# Altium PCB PCB02.PcbDoc
Units mm, origin at the board's own origin, x right, y up, seen from the top; angles counter-clockwise.
Board outline 20 x 26 mm, 2 copper layers (Top Layer, Bottom Layer), stack 1.57 mm thick; 2 components, 4 nets, 12 pads, 0 vias.
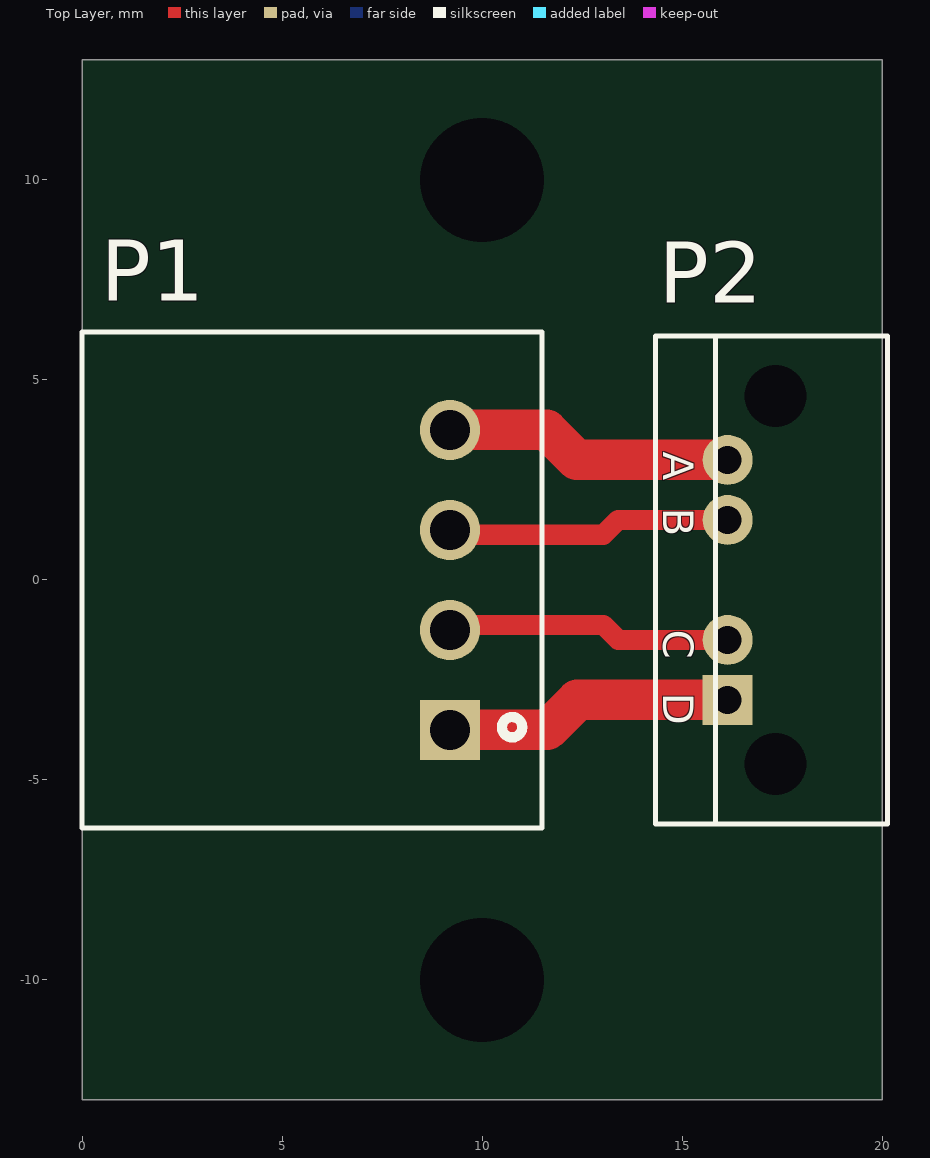
[diagram p0: Top Layer view]
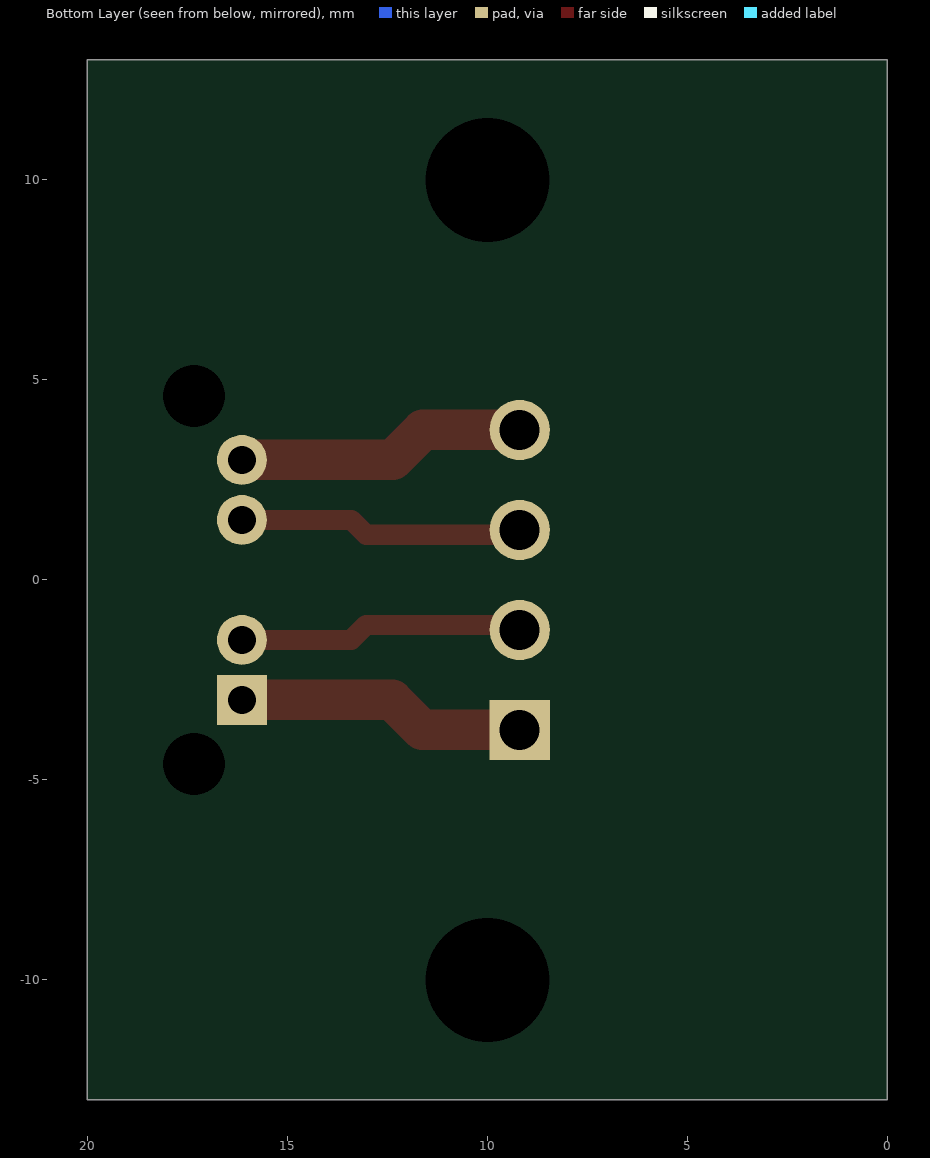
[diagram p1: Bottom Layer view, seen from below]

## Layer stack, top to bottom
Top Solder: solder mask 0.01, Solder Resist, Dk 3.5
Top Layer: signal copper 0.035
Dielectric 1: core 1.5, FR-4, Dk 4.8
Bottom Layer: signal copper 0.035
Bottom Solder: solder mask 0.01, Solder Resist, Dk 3.5

## Board outline
0,-13 20,-13 20,13 0,13

## Design rules (kind name [scope] priority, off if disabled: settings)
Clearance [All] p1: gap=0.254 ignorepadtopadclearanceinfootprint=FALSE except(0.203: THPad-THPad)
HoleSize [All] p1: absolutevalues=TRUE maxlimit=3.1 minlimit=0.025 maxpercent=80.000 minpercent=20.000
MinimumSolderMaskSliver [All] p1: minsoldermaskwidth=0
PolygonConnect [All] p1: connectstyle=Relief reliefconductorwidth=0.254 reliefentries=4 polygonreliefangle="90 Angle" airgapwidth=0.254
RoutingVias [All] p1: holewidth=0.3 width=0.6 viastyle="Through Hole" minholewidth=0.3 minwidth=0.6 maxholewidth=0.3 maxwidth=0.6
SilkToSilkClearance [All] p1: silktosilkclearance=0
SilkToSolderMaskClearance [IsPad] p1: minsilkscreentomaskgap=0 clearancetoexposedcopper=TRUE
SolderMaskExpansion [All] p1: expansion=0.102 istentingtop=FALSE
UnRoutedNet [All] p1: checkbadconnections=TRUE
Width [All] p1: maxlimit=1.27 minlimit=0.254 preferedwidth=0.254 minimp=50.000000 maximp=50.000000 favimp=50.000000
25 further rules are at their usual default settings.

## Components (designator, comment, footprint, x,y, rotation, side; value= is the part's Value field where it differs from the comment)
P1 "S4B-XH-A(LF)(SN)" JST_S4B-XH-A(LF)(SN) 9.195,0 r90 top
P2 "HY41226278AM061265W" HY41226278AM061265W 16.739,0 r270 top

## Footprints (in the part's own frame and the unit in brackets; to place one, negate y for a bottom-side part, rotate by r counter-clockwise, add the part's x,y. Pads: shape width x height; smd on the part's side, far side on the other; paste and mask are expansions set on the pad)
HY41226278AM061265W [mm]
  round 1.25 hole 0.7: 1(-3,-0.6) 2(-1.5,-0.6) 3(1.5,-0.6)
  rect 1.25x1.25 hole 0.7: 4(3,-0.6)
  round 0 hole 1.55 unplated: MH(-4.6,0.6) MH(4.6,0.6)
  silkscreen extent -6.1,-2.4 6.1,3.4, body extent -6.1,-2.1 6.1,6.9, height 4.9
JST_S4B-XH-A(LF)(SN) [mm]
  rect 1.508x1.508 / inner round 1.508 / far side rect 1.508x1.508 hole 1: 1(-3.75,0)
  round 1.508 hole 1: 2(-1.25,0) 3(1.25,0) 4(3.75,0)
  silkscreen extent -6.2,-2.3 6.2,9.2, body extent -6.17,-2.32 6.23,9.18, height 6.15

## Part data
P1: "Conn Shrouded Header (4 Sides) HDR 4 POS 2.5mm Solder RA Side Entry Thru-Hole Box", Package=None, Availability="In Stock", Check_prices=https://www.snapeda.com/parts/S4B-XH-A(LF)(SN)/ACT/view-part/?ref=eda, MF="J.S.T. Manufacturing Co", MP=S4B-XH-A(LF)(SN), Price=None, SnapEDA_Link=https://www.snapeda.com/parts/S4B-XH-A(LF)(SN)/ACT/view-part/?ref=snap
P2: "POGO MALE 5-48V/3A"

## Free pads (board coordinates)
  round 0 hole 3.1 unplated: MH2(10,10) MH3(10,-10)

## Nets (pads, with @x,y where several pads share a name; then routed paths per layer and width w, separated by ;. In a path a pad name is that pad's centre, name@x,y a point inside that pad or via, vN(x,y) a via of type N, cw(c..) or ccw(c..) an arc to the next point about the centre after c; other vN are vias at no path point)
NetP1_1: P1.1 P2.4 | length 7.3
  Top Layer w1.016: P1.1@9.22,-3.75 11.631,-3.75 12.381,-3 P2.4 P2.4@16.164,-3
NetP1_2: P1.2 P2.3 | length 7.2
  Top Layer w0.508: P1.2@9.22,-1.25 9.345,-1.125 13.03,-1.125 13.405,-1.5 P2.3 P2.3@16.164,-1.5 ; P1.2@9.24,-1.25 P1.2@9.278,-1.212
NetP1_3: P1.3 P2.2 | length 7.3
  Top Layer w0.508: P1.3@9.22,1.25 9.345,1.125 P1.3@9.365,1.125 ; P1.3@9.24,1.25 P1.3@9.365,1.125 ; P2.2@16.164,1.5 P2.2 13.405,1.5 13.03,1.125 P1.3@9.365,1.125
NetP1_4: P1.4 P2.1 | length 7.3
  Top Layer w1.016: P1.4@9.22,3.75 11.617,3.75 12.367,3 P2.1 P2.1@16.164,3
pads on no net: P2.MH

## Silkscreen, mask and mechanical layers (free items; w line width, h text height)
Board Outline:
  the board outline again, w0.127
Fabrication:
  drawing of 191 lines, arcs and shapes, not listed
  text "Layer" at 34.292,10.414 h1.52
  text "Name" at 44.704,10.414 h1.52
  text "Material" at 68.32,10.414 h1.52
  text "Thickness" at 90.158,10.414 h1.52
  text "Constant" at 106.663,10.414 h1.52
  text "Board Layer Stack" at 121.138,10.414 h1.52
  text "Top Overlay" at 44.704,7.366 h1.52
  text "Top Solder" at 44.704,4.318 h1.52
  text "Solder Resist" at 68.32,4.318 h1.52
  text "0.010mm" at 90.158,4.318 h1.52
  text "3.5" at 106.663,4.318 h1.52
  text "1" at 34.292,1.27 h1.52
  text "Top Layer" at 44.704,1.27 h1.52
  text "0.035mm" at 90.158,1.27 h1.52
  text "Dielectric 1" at 44.704,-1.778 h1.52
  text "FR-4" at 68.32,-1.778 h1.52
  text "1.500mm" at 90.158,-1.778 h1.52
  text "4.8" at 106.663,-1.778 h1.52
  text "2" at 34.292,-4.826 h1.52
  text "Bottom Layer" at 44.704,-4.826 h1.52
  text "0.035mm" at 90.158,-4.826 h1.52
  text "Bottom Solder" at 44.704,-7.874 h1.52
  text "Solder Resist" at 68.32,-7.874 h1.52
  text "0.010mm" at 90.158,-7.874 h1.52
  text "3.5" at 106.663,-7.874 h1.52
  text "Bottom Overlay" at 44.704,-10.922 h1.52
  text "Total board thickness:" at 34.292,-13.97 h1.52
  text "1.590mm" at 90.158,-13.97 h1.52
Drill Drawing:
  circle w0.254: c2.003,30.285 r0.847
  lines w0.254: 1.156,34.942 2.849,34.942 2.003,33.249 1.156,34.942 ; 1.156,37.482 1.579,37.482 2.003,37.059 2.426,37.482 2.849,37.482 2.426,37.905 2.849,38.329 2.426,38.329 2.003,38.752 1.579,38.329 1.156,38.329 1.579,37.905 1.156,37.482 ; 1.156,40.869 2.849,40.869 2.849,42.562 1.156,42.562 1.156,40.869
  lines w0.381: -0.363,28.296 177.186,28.296 ; -0.363,43.536 177.186,43.536 ; 13.629,24.486 13.629,47.346 ; 27.088,24.486 27.088,47.346 ; 56.036,24.486 56.036,47.346 ; 68.885,24.486 68.885,47.346 ; 87.523,24.486 87.523,47.346 ; 125.612,24.486 125.612,47.346 ; 140.594,24.486 140.594,47.346 ; 159.537,24.486 159.537,47.346 ; -0.363,24.486 177.186,24.486 177.186,47.346 -0.363,47.346 -0.363,24.486
  text "Symbol" at 1.923,44.679 h1.83
  text "Count" at 14.772,44.679 h1.83
  text "Hole Size" at 28.231,44.679 h1.83
  text "Plated" at 57.179,44.679 h1.83
  text "Hole Type" at 70.028,44.679 h1.83
  text "Drill Layer Pair" at 88.666,44.679 h1.83
  text "Via/Pad" at 126.755,44.679 h1.83
  text "Pad Shape" at 141.737,44.679 h1.83
  text "Template" at 160.68,44.679 h1.83
  text "2" at 14.772,40.869 h1.52
  text "61.02mil (1.550mm)" at 28.231,40.869 h1.52
  text "NPTH" at 57.179,40.869 h1.52
  text "Round" at 70.028,40.869 h1.52
  text "Top Layer - Bottom Layer" at 88.666,40.869 h1.52
  text "Pad" at 126.755,40.869 h1.52
  text "Rounded" at 141.737,40.869 h1.52
  text "c0hn155" at 160.68,40.869 h1.52
  text "2" at 14.772,37.059 h1.52
  text "122.05mil (3.100mm)" at 28.231,37.059 h1.52
  text "NPTH" at 57.179,37.059 h1.52
  text "Round" at 70.028,37.059 h1.52
  text "Top Layer - Bottom Layer" at 88.666,37.059 h1.52
  text "Pad" at 126.755,37.059 h1.52
  text "Rounded" at 141.737,37.059 h1.52
  text "c0hn310" at 160.68,37.059 h1.52
  text "4" at 14.772,33.249 h1.52
  text "27.56mil (0.700mm)" at 28.231,33.249 h1.52
  text "PTH" at 57.179,33.249 h1.52
  text "Round" at 70.028,33.249 h1.52
  text "Top Layer - Bottom Layer" at 88.666,33.249 h1.52
  text "Pad" at 126.755,33.249 h1.52
  text "(Mixed)" at 141.737,33.249 h1.52
  text "(Mixed)" at 160.68,33.249 h1.52
  text "4" at 14.772,29.439 h1.52
  text "39.37mil (1.000mm)" at 28.231,29.439 h1.52
  text "PTH" at 57.179,29.439 h1.52
  text "Round" at 70.028,29.439 h1.52
  text "Top Layer - Bottom Layer" at 88.666,29.439 h1.52
  text "Pad" at 126.755,29.439 h1.52
  text "Rounded" at 141.737,29.439 h1.52
  text "(Mixed)" at 160.68,29.439 h1.52
  text "12 Total" at 14.772,25.629 h1.52

## Dimensions
20,13 to 20,-13 on Dimension
0,13 to 20,13 on Dimension

## Text inside footprints (layer, text, board x,y; h text height)
P2: Top Overlay "A" at 14.529,3.2 h0.76 r270; Top Overlay "B" at 14.529,1.803 h0.76 r270; Top Overlay "C" at 14.529,-1.245 h0.76 r270; Top Overlay "D" at 14.529,-2.819 h0.76 r270